# Altium PCB RA09N.PcbDoc
Units mm, origin at the board's own origin, x right, y up, seen from the top; angles counter-clockwise.
Board outline 20 x 24 mm, 2 copper layers (Top Layer, Bottom Layer); 20 components, 20 nets, 120 pads, 38 vias.
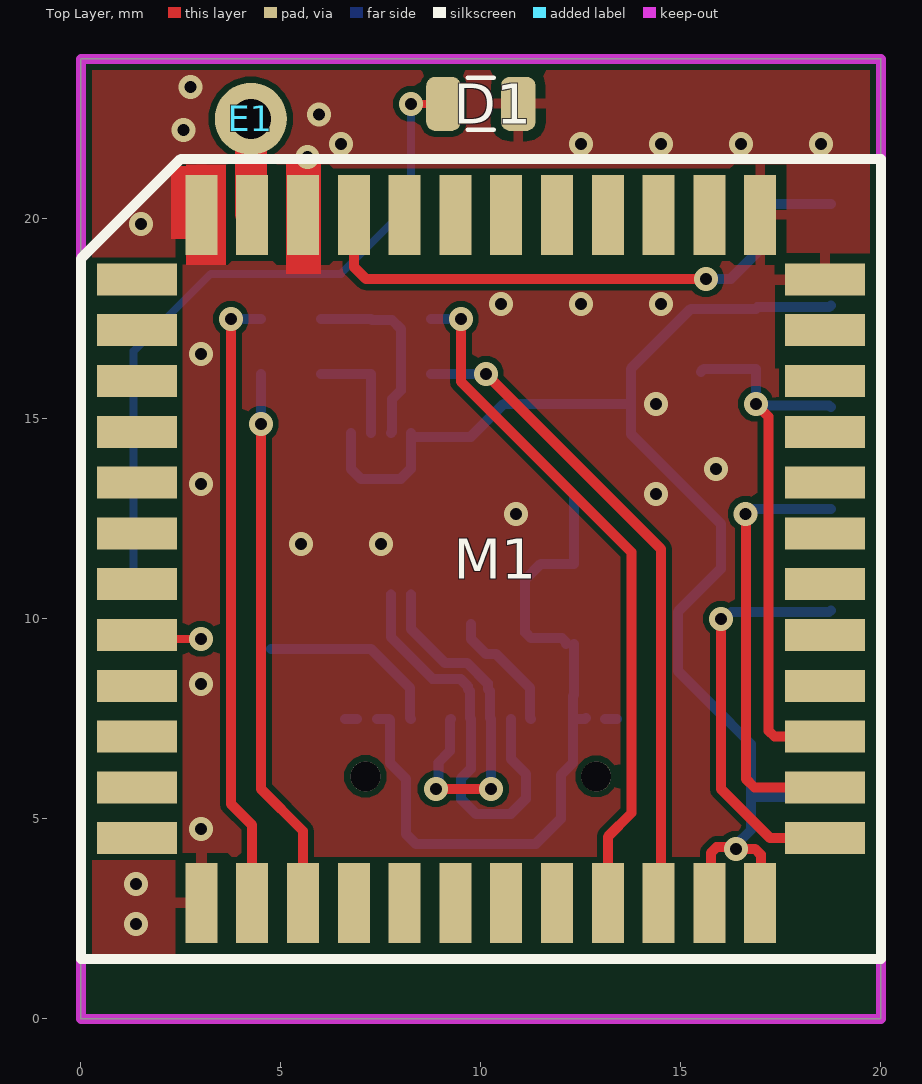
[diagram p0: Top Layer view]
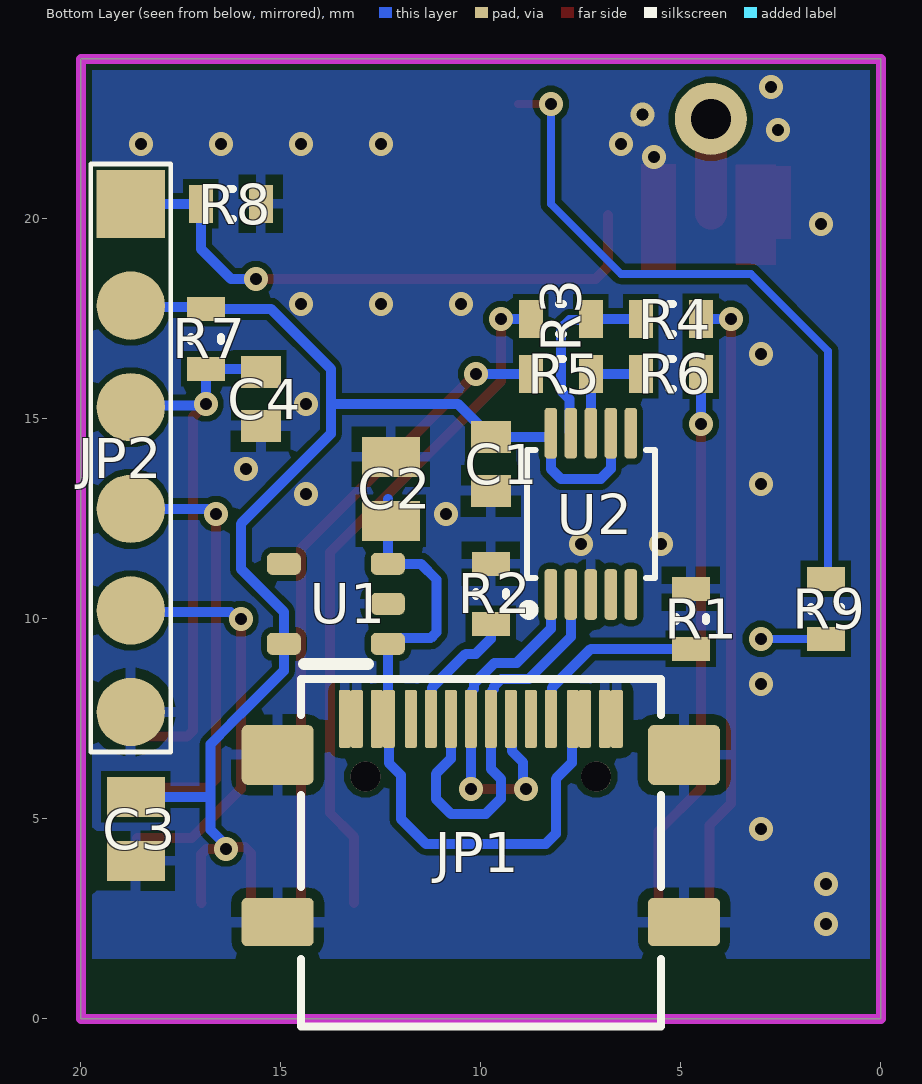
[diagram p1: Bottom Layer view, seen from below]

## Layer stack, top to bottom
Top Solder: solder mask 0.0102, Solder Resist, Dk 3.5
Top Layer: signal copper 0.0356
Dielectric 1: dielectric 0.32, FR-4, Dk 4.8
Bottom Layer: signal copper 0.0356
Bottom Solder: solder mask 0.0102, Solder Resist, Dk 3.5

## Board outline
0,0 20,0 20,24 0,24

## Design rules (kind name [scope] priority, off if disabled: settings)
Clearance [All] p1: gap=0.15 ignorepadtopadclearanceinfootprint=FALSE
ComponentClearance [InComponent('M1') vs InComponent('JP1')] p1: gap=0 collisioncheckmode=3 verticalgap=-1 showdistances=FALSE
MinimumSolderMaskSliver [All] p1: minsoldermaskwidth=0.05
PolygonConnect PolygonConnect_1 [All vs IsNamedPolygon('GND_L01_P000') Or IsNamedPolygon('GND_L02_P001')] p1: thpad.connectstyle=Relief thpad.reliefconductorwidth=0.254 thpad.reliefentries=4 thpad.polygonreliefangle="90 Angle" thpad.airgapwidth=0.254 smdpad.connectstyle=Relief smdpad.reliefconductorwidth=0.254 smdpad.reliefentries=4 smdpad.polygonreliefangle="90 Angle" smdpad.airgapwidth=0.254 via.connectstyle=Direct via.reliefconductorwidth=0.254 via.reliefentries=4 via.polygonreliefangle="90 Angle" via.airgapwidth=0.254
PolygonConnect [All] p2: connectstyle=Relief reliefconductorwidth=0.254 reliefentries=4 polygonreliefangle="90 Angle" airgapwidth=0.254
RoutingVias [All] p1: holewidth=0.711 width=1.27 viastyle="Through Hole" minholewidth=0.711 minwidth=1.27 maxholewidth=0.711 maxwidth=1.27
SilkToSolderMaskClearance [IsPad] p1: minsilkscreentomaskgap=0.1 clearancetoexposedcopper=TRUE
SolderMaskExpansion [All] p1: expansion=0 istentingtop=FALSE
Width [All] p1: maxlimit=1 minlimit=0.15 preferedwidth=0.2
27 further rules are at their usual default settings.

## Components (designator, comment, footprint, x,y, rotation, side; value= is the part's Value field where it differs from the comment)
C1 "100nF" C-0603 9.75,13.875 r90 bottom
C2 "10uF" C-0805 12.25,13.25 r90 bottom
C3 "10uF" C-0805 18.625,4.75 r270 bottom
C4 "100nF" C-0603 15.5,15.5 r90 bottom
D1 "LED_1" LED_0805 10,22.875 r180 top
E1 "SPRING" SPRING433 4.25,22.5 r0 top
JP1 "L-KLS1-5473" L-KLS1-5473 10,7.5 r180 bottom locked
JP2 "HEADER 6" CON6_2.54_SMD 18.75,20.37 r270 bottom
M1 "RA-09" RA09 10,11.5 r0 top locked
R1 "5k1" R-0603 4.75,10 r90 bottom
R2 "5k1" R-0603 9.75,10.625 r90 bottom
R3 "nc" R-0603 8,17.5 r180 bottom
R4 "nc" R-0603 5.25,17.5 r0 bottom
R5 "nc" R-0603 8,16.125 r180 bottom
R6 "nc" R-0603 5.25,16.125 r0 bottom
R7 "10k" R-0603 16.875,17 r90 bottom
R8 "5k1" R-0603 16.25,20.375 r180 bottom
R9 "470" R-0603 1.375,10.25 r270 bottom
U1 "LP5907MFX-3.0" SOT-23-5 13.625,10.375 r0 bottom
U2 "CH340E" MSOP-10 7.25,12.625 r180 bottom value={Value}

## Footprints (in the part's own frame and the unit in brackets; to place one, negate y for a bottom-side part, rotate by r counter-clockwise, add the part's x,y. Pads: shape width x height; smd on the part's side, far side on the other; paste and mask are expansions set on the pad)
C-0603 [mm] "Chip Capacitor, 2-Leads, Body 1,60x0,80mm, IPC Medium Density"
  rect 0.8x1 smd: 1(-0.675,0) 2(0.675,0)
  body extent -0.8,-0.4 0.8,0.4, height 0.8
C-0805 [mm] "Chip Capacitor, 2-Leads, Body 2,00x1,25mm, IPC Medium Density"
  rect 1x1.45 smd: 1(-0.8,0) 2(0.8,0)
  body extent -1,-0.63 1,0.63, height 1.25
CON6_2.54_SMD [mm]
  rect 1.71x1.71 smd paste-2539.97: 1(0,0)
  round 1.71 smd paste-2539.97: 2(2.54,0) 3(5.08,0) 4(7.62,0) 5(10.16,0) 6(12.7,0)
  silkscreen extent -1,-1 13.7,1
L-KLS1-5473 [mm] "USB 3.1 Type C"
  rrect20% 1.8x1.2 smd mask+0.07: 1(-5.08,-5.08) 1(5.08,-5.08)
  rrect20% 1.8x1.5 smd mask+0.07: 1(-5.08,-0.9) 1(5.08,-0.9)
  rrect30% 0.3x1.45 smd paste-2 mask+0.07: A1(-3.1,0) A4(-2.6,0) A9(2.6,0) A12(3.4,0) B1(3.1,0) B4(2.3,0) B9(-2.3,0) B12(-3.4,0)
  rrect30% 0.3x1.45 smd mask+0.07: A5(-1.25,0) A6(-0.25,0) A7(0.25,0) A8(1.25,0) B5(1.75,0) B6(0.75,0) B7(-0.75,0) B8(-1.75,0)
  round 0.75 hole 0.75 unplated paste-2539.97 mask+0.07: MH(-2.885,-1.44) MH(2.885,-1.44)
  silkscreen extent -4.5,-7.69 4.5,1, body extent -4.47,-7.7 4.47,0.2, height 3.2
LED_0805 [mm] "LED, Chip; 2.00 mm L X 1.25 mm W X 0.80 mm H body"
  rrect51% 0.86x1.35 smd: A(0.935,0) K(-0.935,0)
  silkscreen extent -0.33,-0.65 0.33,0.65, body extent -1,-0.63 1,0.63, height 0.25
MSOP-10 [mm] "Small Outline Pkg (SOP), 0.50 mm pitch; 10 pin, 3.00 mm L X 3.00 mm W X 1.10 mm H body"
  rrect52% 0.31x1.27 smd: 1(-1,-2.015) 2(-0.5,-2.015) 3(0,-2.015) 4(0.5,-2.015) 5(1,-2.015) 6(1,2.015) 7(0.5,2.015) 8(0,2.015) 9(-0.5,2.015) 10(-1,2.015)
  silkscreen extent -1.68,-2.52 1.6,1.6, body extent -1.5,-2.42 1.5,2.42, height 1.1
R-0603 [mm] "Chip Resistor, 2-Leads, Body 1,60x0,82mm, IPC Medium Density"
  rect 0.6x0.95 smd: 1(-0.75,0) 2(0.75,0)
  silkscreen extent -0.05,-0.38 0.05,0.38, body extent -0.8,-0.4 0.8,0.4, height 0.45
RA09 [mm]
  rect 2x0.8 smd: 1(-8.6,6.985) 2(-8.6,5.715) 3(-8.6,4.445) 4(-8.6,3.175) 5(-8.6,1.905) 6(-8.6,0.635) 7(-8.6,-0.635) 8(-8.6,-1.905) 9(-8.6,-3.175) 10(-8.6,-4.445) 11(-8.6,-5.715) 12(-8.6,-6.985) 25(8.6,-6.985) 26(8.6,-5.715) 27(8.6,-4.445) 28(8.6,-3.175) 29(8.6,-1.905) 30(8.6,-0.635) 31(8.6,0.635) 32(8.6,1.905) 33(8.6,3.175) 34(8.6,4.445) 35(8.6,5.715) 36(8.6,6.985)
  rect 0.8x2 smd: 13(-6.985,-8.6) 14(-5.715,-8.6) 15(-4.445,-8.6) 16(-3.175,-8.6) 17(-1.905,-8.6) 18(-0.635,-8.6) 19(0.635,-8.6) 20(1.905,-8.6) 21(3.175,-8.6) 22(4.445,-8.6) 23(5.715,-8.6) 24(6.985,-8.6) 37(6.985,8.6) 38(5.715,8.6) 39(4.445,8.6) 40(3.175,8.6) 41(1.905,8.6) 42(0.635,8.6) 43.(-0.635,8.6) 44(-1.905,8.6) 45(-3.175,8.6) 46(-4.445,8.6) 47(-5.715,8.6) 48(-6.985,8.6)
  silkscreen extent -10,-10 10,10, body extent -9.75,-9.75 9.75,9.75, height 2.8
SOT-23-5 [mm]
  rrect50% 0.85x0.55 smd mask+0.06: 1(-1.3,1) 2(-1.3,0) 3(-1.3,-1) 4(1.3,-1) 5(1.3,1)
  silkscreen extent -0.8,1.5 0.8,1.5, body extent -1.4,-1.45 1.4,1.45, height 1.45
SPRING433 [mm]
  round 1.8 hole 1: 1(0,0)
  body extent -3.6,-0.4 3.52,51.8, height 6.52

## Part data
C1 C2 C3 C4: library part CAPN, Voltage=50V, Вид=Конденсатор, Точність/група=NP0
E1: library part ANT, Вид=Антена, Примітки=Пряма
R1 R2 R3 R4 R5 R6 R7 R8 R9: library part RES, Вид=Резистор, Точність/група=5%
U1: library part LP5907, "250mA Low-Dropout Regulator", Вид=Мікросхема
D1: Вид=Світлодіод
JP1 U2: Mounting  Method=SMD
JP2: Вид=Роз'єм

## Via types
v1: diameter 0.6, hole 0.3, Top Layer to Bottom Layer, tented both sides, 27 vias
v2: diameter 0.6, hole 0.3, Top Layer to Bottom Layer, 11 vias

## Nets (pads, with @x,y where several pads share a name; then routed paths per layer and width w, separated by ;. In a path a pad name is that pad's centre, name@x,y a point inside that pad or via, vN(x,y) a via of type N, cw(c..) or ccw(c..) an arc to the next point about the centre after c; other vN are vias at no path point)
BOOT: JP2.1 M1.45 R8.1 | length 14.8
  Top Layer w0.25: M1.45 6.825,18.8 7.125,18.5 v1(15.625,18.5)
  Bottom Layer w0.25: v1(15.625,18.5) 16.25,18.5 17,19.25 R8.1 18.745,20.375 JP2.1
DN: JP1.A7 JP1.B7 U2.2 | length 10.5
  Bottom Layer w0.25: U2.2 7.75,9.543 8.793,8.5 9.488,8.5 9.675,8.313 9.675,8.246 9.725,8.196 9.725,7.525 JP1.A7 9.75,6.25 9.5,6 9.5,5.5 9.875,5.125 10.75,5.125 11.125,5.5 11.125,6.125 10.75,6.5 JP1.B7
DP: JP1.A6 JP1.B6 U2.1 | length 9.3
  Top Layer w0.25: v1(8.875,5.75) v1(10.25,5.75)
  Bottom Layer w0.25: U2.1 8.25,9.75 9.1,8.9 9.653,8.9 10.175,8.378 10.175,8.246 10.225,8.196 10.225,7.525 JP1.A6 v1(10.25,5.75) ; v1(8.875,5.75) 8.942,5.817 8.942,6.412 9.225,6.695 9.225,7.475 JP1.B6
GND: C1.1 C2.2 C3.2 C4.1 D1.K JP1.1 JP1.A1 JP1.A12 JP1.B1 JP1.B12 JP2.6 M1.13 M1.36 M1.37 M1.46 M1.48 R1.2 R2.2 R8.2 U1.2 U2.3 | length 0.6
  Bottom Layer w0.25: JP1.A12 JP1.B1 ; JP1.A1 JP1.B12
  other v1: 1.375,2.375 1.375,3.375 3,4.75 3,8.375 10.875,12.625 14.375,13.125 3,13.375 15.875,13.75 14.375,15.375 3,16.625 5.668,21.544 2.566,22.215 5.958,22.605 2.741,23.301
  other v2: 5.5,11.875 7.5,11.875 10.5,17.875 12.5,17.875 14.5,17.875 1.5,19.875 6.5,21.875 12.5,21.875 14.5,21.875 16.5,21.875 18.5,21.875
LED: M1.8 R9.2 | length 3.4
  Top Layer w0.2: M1.8 1.495,9.5 v1(3,9.5)
  Bottom Layer w0.2: R9.2@1.25,9.5 v1(3,9.5)
NetD1_A: D1.A R9.1 | length 17.5
  Top Layer w0.2: v1(8.25,22.875) D1.A
  Bottom Layer w0.2: R9.1@1.25,11 1.315,11.065 1.315,16.69 3.25,18.625 6.5,18.625 8.25,20.375 v1(8.25,22.875)
NetE1_1: E1.1 M1.47 | length 2.4
  Top Layer w0.25: M1.47@4.25,20.135 M1.47
  Top Layer w0.8: M1.47@4.25,20.135 E1.1
NetJP1_A5: JP1.A5 R2.1 | length 3.1
  Bottom Layer w0.25: R2.1 9.75,9.5 10.125,9.125 10.375,9.125 11.225,8.275 11.225,7.525 JP1.A5
NetJP1_B5: JP1.B5 R1.1 | length 4.7
  Bottom Layer w0.25: R1.1 7.25,9.25 8.225,8.275 8.225,7.525 JP1.B5
NRST: C4.2 JP2.3 M1.27 R7.1 | length 14
  Top Layer w0.25: v1(16.875,15.375) 16.875,15.374 17.195,15.054 17.195,7.201 17.341,7.055 M1.27
  Bottom Layer w0.25: C4.2 15.575,16.25 R7.1 v1(16.875,15.375) 16.917,15.332 18.708,15.332 JP2.3
PA2: M1.21 R3.1 | length 17.4
  Top Layer w0.25: v1(9.5,17.5) 9.5,15.937 13.77,11.667 13.77,5.145 13.175,4.55 M1.21
  Bottom Layer w0.25: R3.1 v1(9.5,17.5)
PA3: M1.22 R5.1 | length 16.4
  Top Layer w0.25: v1(10.125,16.125) 14.5,11.75 14.5,2.955 M1.22
  Bottom Layer w0.25: R5.1 v1(10.125,16.125)
PA9: M1.14 R4.1 | length 15.4
  Top Layer w0.25: v1@3.75,17.375 3.75,5.375 4.285,4.84 M1.14
  Bottom Layer w0.25: v1(3.75,17.5) R4.1
PA10: M1.15 R6.1 | length 13.7
  Top Layer w0.25: v1(4.5,14.875) 4.5,5.75 5.555,4.695 M1.15
  Bottom Layer w0.25: v1(4.5,14.875) R6.1
RXD: R5.2 R6.2 U2.8 | length 2.7
  Bottom Layer w0.25: R6.2 R5.2 U2.8
SWCLK: JP2.4 M1.26 | length 10.9
  Top Layer w0.25: v1(16.62,12.625) 16.625,12.62 16.625,6 16.84,5.785 M1.26
  Bottom Layer w0.25: v1(16.62,12.625) 16.715,12.625 16.84,12.75 JP2.4
SWDIO: JP2.5 M1.25 | length 10.2
  Top Layer w0.25: v1(16,10) 16,5.75 17.235,4.515 M1.25
  Bottom Layer w0.25: v1(16,10) 16.095,10 16.262,10.168 18.708,10.168 JP2.5
TXD: R3.2 R4.2 U2.9 | length 4.8
  Bottom Layer w0.25: R4.2 R3.2 7.279,17.471 7.779,17.471 8,17.25 8,15.711 7.78,15.491 7.78,14.67 U2.9
VBUS: C2.1 JP1.A4 JP1.A9 JP1.B4 JP1.B9 U1.1 U1.3 | length 17.9
  Bottom Layer w0.25: JP1.A9 JP1.B4 7.725,7.475 7.725,6.4 8.125,6 8.125,4.625 8.375,4.375 11.375,4.375 12,5 12,6.094 12.3,6.394 JP1.B9 ; U1.1@12.125,9.375 12.125,9.418 12.026,9.517 11.254,9.517 11.108,9.664 11.108,10.983 11.5,11.375 U1.3 12.325,13 ; U1.1 12.325,8.1 12.3,8.075 JP1.B9 ; JP1.A4@12.625,7.525 JP1.A4 JP1.B9
VCC: C1.2 C3.1 JP2.2 M1.23 M1.24 R7.2 U1.5 U2.7 U2.10 | length 35
  Top Layer w0.25: M1.23 15.75,2.935 15.75,4.146 15.896,4.293 v1@16.332,4.293 ; v1@16.389,4.25 v1(16.375,4.25) 16.854,4.25 17,4.104 17,2.915 M1.24
  Bottom Layer w0.25: U2.7 6.75,13.75 7,13.5 8,13.5 8.25,13.75 U2.10 ; U2.10@8.25,14.58 8.28,14.55 C1.2 10.575,15.375 13.75,15.375 ; v1(16.375,4.25) 16.375,4.345 16.755,4.724 16.755,5.55 ; C3.1 16.755,5.55 ; JP2.2 18.71,17.79 16.915,17.79 R7.2 15.25,17.75 13.75,16.25 13.75,15.375 ; 13.75,15.375 13.75,14.625 16,12.375 16,11.25 14.925,10.175 U1.5 14.925,8.7 16,7.625 16.006,7.625 16.255,7.376 16.255,7.37 16.755,6.87 16.755,5.55
pads on no net: JP1.A8 JP1.B8 JP1.MH M1.1 M1.2 M1.3 M1.4 M1.5 M1.6 M1.7 M1.9 M1.10 M1.11 M1.12 M1.16 M1.17 M1.18 M1.19 M1.20 M1.28 M1.29 M1.30 M1.31 M1.32 M1.33 M1.34 M1.35 M1.38 M1.39 M1.40 M1.41 M1.42 M1.43. M1.44 U1.4 U2.4 U2.5 U2.6

## Polygon pours and split planes (outlines as drawn)
GND on Top Layer "GND_L01_P000" (solid, remove dead copper, pour order 0): 0,1.5 20,1.5 20,24 0,24
GND on Bottom Layer "GND_L02_P001" (solid, remove dead copper, pour order 1): 0,1.5 20,1.5 20,24 0,24

## Keep-outs
Keep-Out Layer:
  the board outline again, w0.254

## Other copper
Top Layer:
  rectangle net GND: 2.25,19.5 2.75,21.317
  rectangle net GND: 5.125,18.625 6,21.375
  rectangle net GND: 2.625,18.846 3.628,21.354
  pour cut-out: 0.282,19.035 0.282,3.965 2.55,3.965 2.55,19.035
  pour cut-out: 6.105,4.05 6.105,1.782 15.5,1.782 15.5,4.05
  pour cut-out: 17.346,17.831 17.346,16.25 19.75,16.25 19.75,17.875
  pour cut-out: 6.975,21.25 6.975,18.65 15.15,18.65 15.165,18.665 15.165,21.25